# Altium PCB pic_programmer.altium-saved.PcbDoc
Units mil, origin at the board's own origin, x right, y up, seen from the top; angles counter-clockwise.
Board outline 6300 x 3900 mil, 2 copper layers (top_layer, bottom_layer), stack 65.792 mil thick; 63 components, 111 nets, 247 pads, 6 vias.
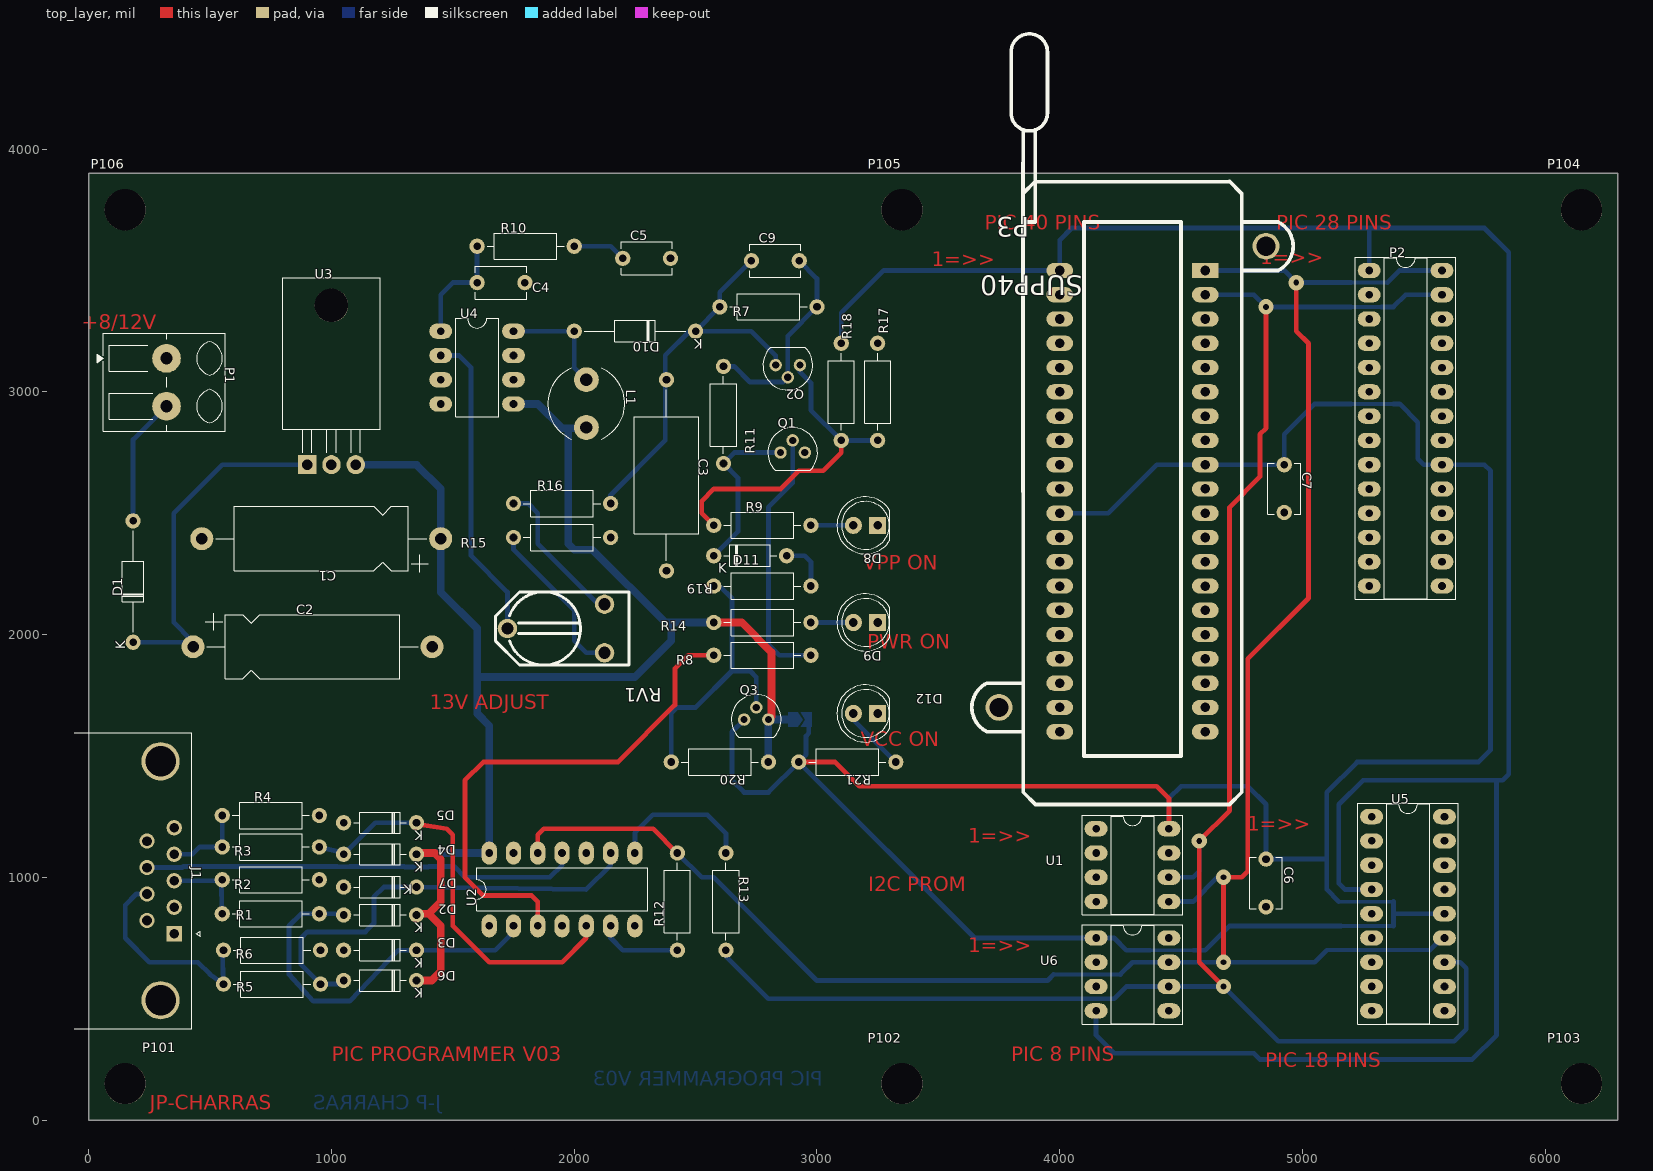
[diagram p0: top_layer view]
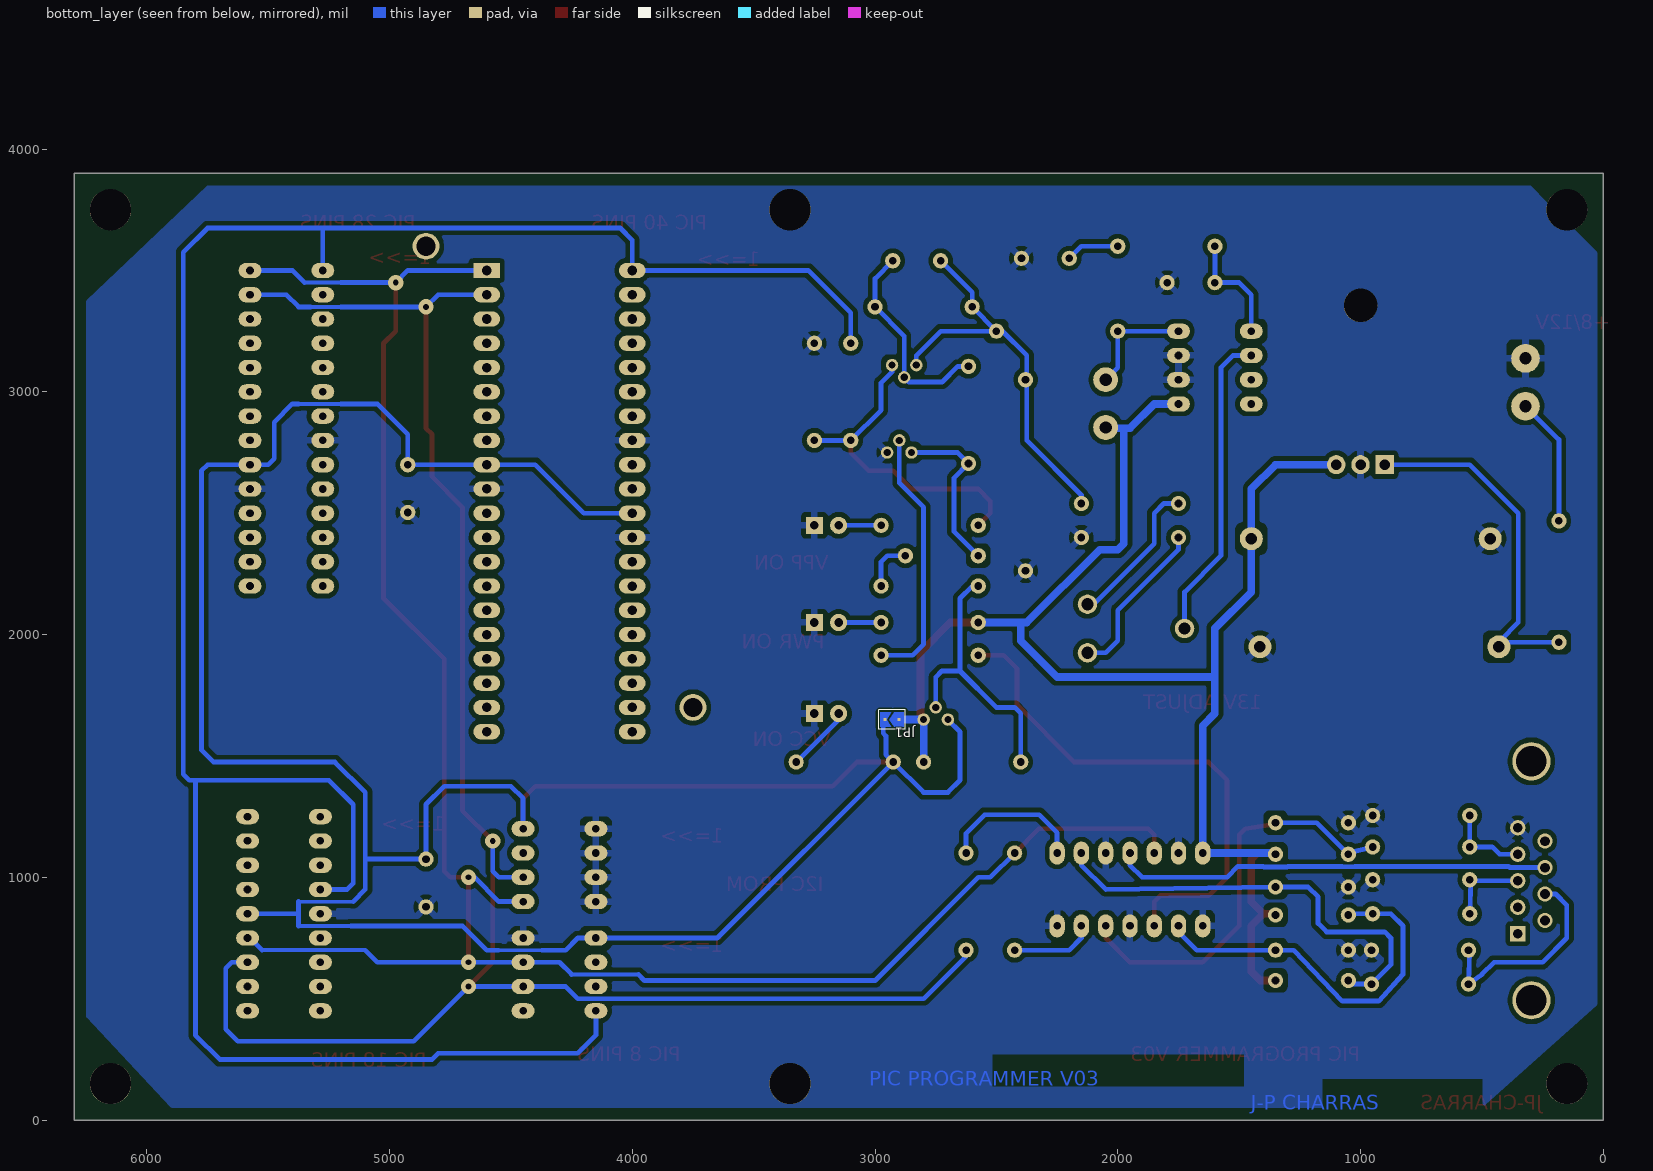
[diagram p1: bottom_layer view, seen from below]

## Layer stack, top to bottom
Top Solder: solder mask 0.4, Solder Resist, Dk 3.5
top_layer: signal copper 1.4
Dielectric 1: core 62.9921, FR-4, Dk 4.5
bottom_layer: signal copper 1.4
Bottom Solder: solder mask 0.4, Solder Resist, Dk 3.5

## Board outline
6300,0 0,0 0,3900 3950,3900 6300,3900

## Design rules (kind name [scope] priority, off if disabled: settings)
BoardOutlineClearance [All] p1: gap=0.39 ignorepadtopadclearanceinfootprint=FALSE
Clearance Clearance_POWER [InNetClass('POWER')] p1: gap=11.02 ignorepadtopadclearanceinfootprint=FALSE
Clearance "Clearance_Polygon 0" [InNamedPolygon('Polygon 0')] p2: gap=20 ignorepadtopadclearanceinfootprint=FALSE
Clearance [All] p3: gap=9.84 ignorepadtopadclearanceinfootprint=FALSE
DiffPairsRouting [All] p1: maxlimit=9.84 minlimit=9.84 mostfreqgap=9.84 toplayer_minwidth=15 toplayer_maxwidth=15 toplayer_prefwidth=9.84 bottomlayer_minwidth=15 bottomlayer_maxwidth=15 bottomlayer_prefwidth=15 maxuncoupledlength=500
HoleSize [All] p1: absolutevalues=TRUE maxlimit=169.29 minlimit=19.68 maxpercent=80.000 minpercent=20.000
HoleToHoleClearance [All] p1: gap=9.84 allowstackedmicrovias=FALSE
MinimumAnnularRing [All] p1: minimumring=1.97
PolygonConnect "PolygonConnect_Polygon 0" [InNamedPolygon('Polygon 0')] p1: connectstyle=Relief reliefconductorwidth=25 reliefentries=4 polygonreliefangle="90 Angle" airgapwidth=20
PolygonConnect [All] p2: connectstyle=Relief reliefconductorwidth=19.68 reliefentries=4 polygonreliefangle="90 Angle" airgapwidth=19.68
RoutingVias RoutingVias_POWER [InNetClass('POWER')] p1: holewidth=23.62 width=62.99 viastyle="Through Hole" minholewidth=19.68 minwidth=35.43 maxholewidth=23.62 maxwidth=62.99
RoutingVias [All] p2: holewidth=23.62 width=62.99 viastyle="Through Hole" minholewidth=19.68 minwidth=35.43 maxholewidth=23.62 maxwidth=62.99
SilkToSilkClearance [All] p1: silktosilkclearance=0
SolderMaskExpansion [All] p1: expansion=0 istentingtop=FALSE
Width Width_POWER [InNetClass('POWER')] p1: maxlimit=31.5 minlimit=9.84 preferedwidth=31.5
Width [All] p2: maxlimit=31.5 minlimit=9.84 preferedwidth=19.68
26 further rules are at their usual default settings.

## Classes and differential pairs
net class POWER: GND VCC

## Components (designator, comment, footprint, x,y, rotation, side; value= is the part's Value field where it differs from the comment)
C1 "100µF" CP_Axial_L18.0mm_D6.5mm_P25.00mm_Horizontal 1450,2395 r180 top
C2 "220uF" CP_Axial_L18.0mm_D6.5mm_P25.00mm_Horizontal 430,1950 r0 top
C3 "22uF/25V" C_Axial_L12.0mm_D6.5mm_P20.00mm_Horizontal 2380,3050 r270 top
C4 "0" C_Disc_D5.1mm_W3.2mm_P5.00mm 1600,3450 r0 top
C5 "10nF" C_Disc_D5.1mm_W3.2mm_P5.00mm 2200,3550 r0 top
C6 "100nF" C_Disc_D5.1mm_W3.2mm_P5.00mm 4850,1075 r270 top
C7 "100nF" C_Disc_D5.1mm_W3.2mm_P5.00mm 4925,2700 r270 top
C9 "220nF" C_Disc_D5.1mm_W3.2mm_P5.00mm 2730,3540 r0 top
D1 "1N4004" D_DO-35_SOD27_P12.70mm_Horizontal 182.68,1968.5 r90 top
D2 "BAT43" D_DO-35_SOD27_P7.62mm_Horizontal 1350,845 r180 top
D3 "BAT43" D_DO-35_SOD27_P7.62mm_Horizontal 1350,700 r180 top
D4 "BAT43" D_DO-35_SOD27_P7.62mm_Horizontal 1350,1095 r180 top
D5 "BAT43" D_DO-35_SOD27_P7.62mm_Horizontal 1350,1225 r180 top
D6 "BAT43" D_DO-35_SOD27_P7.62mm_Horizontal 1350,575 r180 top
D7 "BAT43" D_DO-35_SOD27_P7.62mm_Horizontal 1350,960 r180 top
D8 "RED-LED" LED_D5.0mm 3250,2450 r180 top
D9 "GREEN-LED" LED_D5.0mm 3250,2050 r180 top
D10 "SCHOTTKY" D_DO-35_SOD27_P12.70mm_Horizontal 2500,3250 r180 top
D11 "BAT43" D_DO-35_SOD27_P7.62mm_Horizontal 2575,2325 r0 top
D12 "YELLOW-LED" LED_D5.0mm 3250,1675 r180 top
J1 "DB9-FEMAL" DSUB-9_Socket_Horizontal_P2.77x2.84mm_EdgePinOffset7.70mm_Housed_MountingHolesOffset9.12mm 351.97,767.72 r270 top
JP1 "JUMPER" SolderJumper-2_P1.3mm_Open_TrianglePad1.0x1.5mm 2930,1650 r0 bottom
L1 "22uH" L_Radial_D7.8mm_P5.00mm_Fastron_07HCP 2050,3050 r270 top
P1 "CONN_2" Altech_AK300_1x02_P5.00mm_45-Degree 320.47,3137.8 r270 top
P2 "SUPP28" DIP-28_W7.62mm_Socket_LongPads 5275,3500 r0 top
P3 "SUPP40" 40tex-Ell600 4000,3500 r0 top
P101 "CONN_1" MountingHole_4.3mm_M4 150,150 r0 top
P102 "CONN_1" MountingHole_4.3mm_M4 3350,150 r0 top
P103 "CONN_1" MountingHole_4.3mm_M4 6150,150 r0 top
P104 "CONN_1" MountingHole_4.3mm_M4 6150,3750 r0 top
P105 "CONN_1" MountingHole_4.3mm_M4 3350,3750 r0 top
P106 "CONN_1" MountingHole_4.3mm_M4 150,3750 r0 top
Q1 "BC237" TO-92 2850,2750 r0 top
Q2 "BC307" TO-92 2930,3110 r180 top
Q3 "BC307" TO-92 2700,1650 r0 top
R1 "10K" R_Axial_DIN0207_L6.3mm_D2.5mm_P10.16mm_Horizontal 550,850 r0 top
R2 "10K" R_Axial_DIN0207_L6.3mm_D2.5mm_P10.16mm_Horizontal 550,990 r0 top
R3 "10K" R_Axial_DIN0207_L6.3mm_D2.5mm_P10.16mm_Horizontal 550,1125 r0 top
R4 "10K" R_Axial_DIN0207_L6.3mm_D2.5mm_P10.16mm_Horizontal 550,1255 r0 top
R5 "10K" R_Axial_DIN0207_L6.3mm_D2.5mm_P10.16mm_Horizontal 555,560 r0 top
R6 "10K" R_Axial_DIN0207_L6.3mm_D2.5mm_P10.16mm_Horizontal 555,700 r0 top
R7 "10K" R_Axial_DIN0207_L6.3mm_D2.5mm_P10.16mm_Horizontal 2600,3350 r0 top
R8 "1K" R_Axial_DIN0207_L6.3mm_D2.5mm_P10.16mm_Horizontal 2575,1915 r0 top
R9 "2.2K" R_Axial_DIN0207_L6.3mm_D2.5mm_P10.16mm_Horizontal 2575,2450 r0 top
R10 "5,1K" R_Axial_DIN0207_L6.3mm_D2.5mm_P10.16mm_Horizontal 1600,3600 r0 top
R11 "22K" R_Axial_DIN0207_L6.3mm_D2.5mm_P10.16mm_Horizontal 2615,2705 r90 top
R12 "470" R_Axial_DIN0207_L6.3mm_D2.5mm_P10.16mm_Horizontal 2425,700 r90 top
R13 "470" R_Axial_DIN0207_L6.3mm_D2.5mm_P10.16mm_Horizontal 2625,1100 r270 top
R14 "470" R_Axial_DIN0207_L6.3mm_D2.5mm_P10.16mm_Horizontal 2575,2050 r0 top
R15 "6.2K" R_Axial_DIN0207_L6.3mm_D2.5mm_P10.16mm_Horizontal 1750,2400 r0 top
R16 "62K" R_Axial_DIN0207_L6.3mm_D2.5mm_P10.16mm_Horizontal 1750,2540 r0 top
R17 "22K" R_Axial_DIN0207_L6.3mm_D2.5mm_P10.16mm_Horizontal 3250,2800 r90 top
R18 "220" R_Axial_DIN0207_L6.3mm_D2.5mm_P10.16mm_Horizontal 3100,2800 r90 top
R19 "2.2K" R_Axial_DIN0207_L6.3mm_D2.5mm_P10.16mm_Horizontal 2975,2200 r180 top
R20 "2.2K" R_Axial_DIN0207_L6.3mm_D2.5mm_P10.16mm_Horizontal 2800,1475 r180 top
R21 "470" R_Axial_DIN0207_L6.3mm_D2.5mm_P10.16mm_Horizontal 3325,1475 r180 top
RV1 "1K" RV2X4 2125,1925 r180 top
U1 "24Cxx" DIP-8_W7.62mm_Socket_LongPads 4150,1200 r0 top
U2 "74HC125" DIP-14_W7.62mm_LongPads 1650,800 r90 top
U3 "7805" TO-220-3_Horizontal_TabDown 900,2700 r0 top
U4 "LT1373" DIP-8_W7.62mm_LongPads 1450,3250 r0 top
U5 "PIC_18_PINS" DIP-18_W7.62mm_Socket_LongPads 5285,1250 r0 top
U6 "PIC_8_PINS" DIP-8_W7.62mm_Socket_LongPads 4150,750 r0 top

## Footprints (in the part's own frame and the unit in brackets; to place one, negate y for a bottom-side part, rotate by r counter-clockwise, add the part's x,y. Pads: shape width x height; smd on the part's side, far side on the other; paste and mask are expansions set on the pad)
40tex-Ell600 [mm]
  oval 2.8x1.6 hole 1: 1(0,0) 2(0,-2.54) 3(0,-5.08) 4(0,-7.62) 5(0,-10.16) 6(0,-12.7) 7(0,-15.24) 8(0,-17.78) 9(0,-20.32) 10(0,-22.86) 11(0,-25.4) 12(0,-27.94) 13(0,-30.48) 14(0,-33.02) 15(0,-35.56) 16(0,-38.1) 17(0,-40.64) 18(0,-43.18) 19(0,-45.72) 20(0,-48.26) 21(15.24,-48.26) 22(15.24,-45.72) 23(15.24,-43.18) 24(15.24,-40.64) 25(15.24,-38.1) 26(15.24,-35.56) 27(15.24,-33.02) 28(15.24,-30.48) 29(15.24,-27.94) 30(15.24,-25.4) 31(15.24,-22.86) 32(15.24,-20.32) 33(15.24,-17.78) 34(15.24,-15.24) 35(15.24,-12.7) 36(15.24,-10.16) 37(15.24,-7.62) 38(15.24,-5.08) 39(15.24,-2.54)
  rect 2.8x1.6 hole 1: 40(15.24,0)
  round 2.8 hole 2: ""(-6.35,-45.72) ""(21.59,2.54)
  silkscreen extent -9.19,-55.88 24.43,24.76
Altech_AK300_1x02_P5.00mm_45-Degree [mm]
  round 3 hole 1.3: 1(0,0) 2(5,0)
  silkscreen extent -2.62,-7.23 7.62,6.12
C_Axial_L12.0mm_D6.5mm_P20.00mm_Horizontal [mm]
  round 1.6 hole 0.8: 1(0,0) 2(20,0)
  silkscreen extent 1.04,-3.37 18.96,3.37
C_Disc_D5.1mm_W3.2mm_P5.00mm [mm]
  round 1.6 hole 0.8: 1(0,0) 2(5,0)
  silkscreen extent -0.17,-1.72 5.17,1.72
CP_Axial_L18.0mm_D6.5mm_P25.00mm_Horizontal [mm]
  round 2.4 hole 1.2: 1(0,0) 2(25,0)
  silkscreen extent 1.28,-3.37 23.56,3.5
D_DO-35_SOD27_P7.62mm_Horizontal [mm]
  round 1.6 hole 0.8: 1(0,0) 2(7.62,0)
  silkscreen extent 1.04,-1.12 6.58,1.12
D_DO-35_SOD27_P12.70mm_Horizontal [mm]
  round 1.6 hole 0.8: 1(0,0) 2(12.7,0)
  silkscreen extent 1.04,-1.12 11.66,1.12
DIP-8_W7.62mm_LongPads [mm]
  oval 2.4x1.6 hole 0.8: 1(0,0) 2(0,-2.54) 3(0,-5.08) 4(0,-7.62) 5(7.62,-7.62) 6(7.62,-5.08) 7(7.62,-2.54) 8(7.62,0)
  silkscreen extent 1.56,-8.95 6.06,1.33
DIP-8_W7.62mm_Socket_LongPads [mm]
  oval 2.4x1.6 hole 0.8: 1(0,0) 2(0,-2.54) 3(0,-5.08) 4(0,-7.62) 5(7.62,-7.62) 6(7.62,-5.08) 7(7.62,-2.54) 8(7.62,0)
  silkscreen extent -1.44,-9.01 9.06,1.39
DIP-14_W7.62mm_LongPads [mm]
  oval 2.4x1.6 hole 0.8: 1(0,0) 2(0,-2.54) 3(0,-5.08) 4(0,-7.62) 5(0,-10.16) 6(0,-12.7) 7(0,-15.24) 8(7.62,-15.24) 9(7.62,-12.7) 10(7.62,-10.16) 11(7.62,-7.62) 12(7.62,-5.08) 13(7.62,-2.54) 14(7.62,0)
  silkscreen extent 1.56,-16.57 6.06,1.33
DIP-18_W7.62mm_Socket_LongPads [mm]
  oval 2.4x1.6 hole 0.8: 1(0,0) 2(0,-2.54) 3(0,-5.08) 4(0,-7.62) 5(0,-10.16) 6(0,-12.7) 7(0,-15.24) 8(0,-17.78) 9(0,-20.32) 10(7.62,-20.32) 11(7.62,-17.78) 12(7.62,-15.24) 13(7.62,-12.7) 14(7.62,-10.16) 15(7.62,-7.62) 16(7.62,-5.08) 17(7.62,-2.54) 18(7.62,0)
  silkscreen extent -1.44,-21.71 9.06,1.39
DIP-28_W7.62mm_Socket_LongPads [mm]
  oval 2.4x1.6 hole 0.8: 1(0,0) 2(0,-2.54) 3(0,-5.08) 4(0,-7.62) 5(0,-10.16) 6(0,-12.7) 7(0,-15.24) 8(0,-17.78) 9(0,-20.32) 10(0,-22.86) 11(0,-25.4) 12(0,-27.94) 13(0,-30.48) 14(0,-33.02) 15(7.62,-33.02) 16(7.62,-30.48) 17(7.62,-27.94) 18(7.62,-25.4) 19(7.62,-22.86) 20(7.62,-20.32) 21(7.62,-17.78) 22(7.62,-15.24) 23(7.62,-12.7) 24(7.62,-10.16) 25(7.62,-7.62) 26(7.62,-5.08) 27(7.62,-2.54) 28(7.62,0)
  silkscreen extent -1.44,-34.41 9.06,1.39
DSUB-9_Socket_Horizontal_P2.77x2.84mm_EdgePinOffset7.70mm_Housed_MountingHolesOffset9.12mm [mm]
  rect 1.6x1.6 hole 1: 1(0,0)
  round 1.6 hole 1: 2(-2.77,0) 3(-5.54,0) 4(-8.31,0) 5(-11.08,0) 6(-1.385,-2.84) 7(-4.155,-2.84) 8(-6.925,-2.84) 9(-9.695,-2.84)
  round 4 hole 3.2: SH(-18.04,-1.42) SH(6.96,-1.42)
  silkscreen extent -21.02,-10.48 9.94,2.75
L_Radial_D7.8mm_P5.00mm_Fastron_07HCP [mm]
  round 2.6 hole 1.3: 1(0,0) 2(5,0)
  silkscreen extent -1.2,-4.02 6.2,4.02
LED_D5.0mm [mm]
  rect 1.8x1.8 hole 0.9: 1(0,0)
  round 1.8 hole 0.9: 2(2.54,0)
  silkscreen extent -1.29,-2.99 4.26,2.99
MountingHole_4.3mm_M4 [mm]
  round 4.3 hole 4.3 unplated: ""(0,0)
R_Axial_DIN0207_L6.3mm_D2.5mm_P10.16mm_Horizontal [mm]
  round 1.6 hole 0.8: 1(0,0) 2(10.16,0)
  silkscreen extent 1.04,-1.37 9.12,1.37
RV2X4 [mil]
  round 80 hole 50: 1(0,0) 2(400,-100) 3(0,-200)
  silkscreen extent -100,-251 450,50
SolderJumper-2_P1.3mm_Open_TrianglePad1.0x1.5mm [mm]
  rect 0.3x0.3 smd paste-0.3: 1(-0.725,0) 2(0.725,0)
  top_layer region: 0.275,0 -0.225,-0.75 -1.225,-0.75 -1.225,0.75 -0.225,0.75
  top_layer region: 1.225,-0.75 0.075,-0.75 0.575,0 0.075,0.75 1.225,0.75
  silkscreen extent -1.4,-1 1.4,1
TO-92 [mm]
  round 1.3 hole 0.75: 1(0,0) 2(1.27,1.27) 3(2.54,0)
  silkscreen extent -1.33,-1.85 3.87,2.6
TO-220-3_Horizontal_TabDown [mm]
  rect 1.905x2 hole 1.1: 1(0,0)
  oval 1.905x2 hole 1.1: 2(2.54,0) 3(5.08,0)
  round 3.5 hole 3.5 unplated: ""(2.54,16.66)
  silkscreen extent -2.57,1.26 7.65,19.57

## Via types
v1: diameter 62.99, hole 23.62, top_layer to bottom_layer, 6 vias

## Nets (pads, with @x,y where several pads share a name; then routed paths per layer and width w, separated by ;. In a path a pad name is that pad's centre, name@x,y a point inside that pad or via, vN(x,y) a via of type N, cw(c..) or ccw(c..) an arc to the next point about the centre after c; other vN are vias at no path point)
/CLOCK-RB6: P2.27 P3.39 R13.2 U1.6 U5.12 U6.6 | length 7874.6
  top_layer w19.68: v1(4675,550) 4575,650 v1(4575,1150) 4700,1275 4700,2525 4825,2650 4825,2825 4850,2850 v1(4850,3350)
  bottom_layer w17: 4075,500 4225,500 ; 5200,3350 5325,3350
  bottom_layer w19.68: R13.2 2625,675 2800,500 4075,500 ; 4225,500 4275,550 U6.6 v1(4675,550) 4900,325 5625,325 5675,375 5675,625 5650,650 U5.12@5575,650 ; U1.6 4550,1000 4575,1025 v1(4575,1150) ; P3.39 4800,3400 v1(4850,3350) 5200,3350 ; 5325,3350 5375,3350 5425,3400 P2.27
/DATA-RB7: P2.28 P3.40 R12.2 U1.5 U2.12 U5.13 U6.7 | length 8434.2
  top_layer w19.68: U2.12 1850,1175 1875,1200 2325,1200 R12.2 ; v1(4675,650) v1(4675,1000) 4750,1000 4775,1025 4775,1900 5025,2150 5025,3200 4975,3250 v1(4975,3450)
  bottom_layer w15.75: 5100,700 5525,700
  bottom_layer w17: 3975,600 4250,600 ; 5200,3450 5350,3450
  bottom_layer w19.68: R12.2 2525,1000 2575,1000 3000,575 3950,575 3975,600 ; 4250,600 4300,650 U6.7 v1(4675,650) 5050,650 5100,700 ; U1.5 4550,900 4650,1000 v1(4675,1000) ; P3.40 4925,3500 v1(4975,3450) 5200,3450 ; 5350,3450 5400,3500 P2.28 ; 5525,700 U5.13@5575,750
/PC-CLOCK-OUT: J1.7 R5.1 R6.1 | length 865
  bottom_layer w19.68: J1.7 195.62,931.3 150,885.68 150,875 150,750 250,650 450,650 500,600 R5.1 R6.1@550,700
/PC-DATA-IN: J1.8 U2.11 | length 1804.1
  bottom_layer w19.68: J1.8 384.45,1040.35 389.09,1045 445,1045 1024.25,1045 1025.43,1043.82 1074.57,1043.82 1075.75,1045 1299.45,1045 1301.81,1042.64 1398.19,1042.64 1400.55,1045 1505,1045 1550,1000 1900,1000 1950,1050 U2.11
/PC-DATA-OUT: J1.4 R3.1 R4.1 | length 340.5
  bottom_layer w19.68: J1.4 427.26,1094.88 457.38,1125 R3.1 R4.1
/pic_sockets/VCC_PIC: C6.1 C7.1 JP1.2 P2.20 P3.11 P3.32 Q3.1 R21.2 U1.8 U5.14 U6.1 | length 11516.6
  top_layer w19.68: R21.2 3075,1475 3175,1375 3800,1375 4400,1375 4450,1325 U1.8
  bottom_layer w13.78: 4371.65,700 4550,700 ; 5150,900 5375,900
  bottom_layer w15.75: 5160.39,799.61 5321.62,799.61 5322.02,800 5375,800 ; 5200,2950 5375,2950
  bottom_layer w19.68: Q3.1 2650,1600 2650,1400 2700,1350 2800,1350 R21.2 ; 2966.42,1650 2966.42,1593.54 2955,1582.13 2955,1505 R21.2 ; P3.11 4200,2500 4400,2700 P3.32 C7.1 4925,2825 5050,2950 5200,2950 ; 4371.65,700 4275,700 4225,750 U6.1 3650,750 R21.2 ; U1.8 4450,1325 4500,1375 4775,1375 4850,1300 C6.1 5100,1075 ; 4550,700 4600,700 4700,800 5160,800 5160.39,799.61 ; 5150,900 5100,950 5100,1075 ; 5375,800 5375,850 ; 5375,900 5375,850 ; 5375,2950 5400,2950 5475,2875 5475,2725 5500,2700 P2.20 5750,2700 5775,2675 5775,1525 5725,1475 5225,1475 5100,1350 5100,1075 ; U5.14@5575,850 5375,850
/VPP_ON: J1.3 R1.1 R2.1 | length 339.8
  bottom_layer w19.68: J1.3 545.83,985.83 R2.1 ; R2.1@545,990 R1.1
/VPP{slash}MCLR: P2.1 P3.1 R18.2 U5.4 U6.4 | length 9554.6
  bottom_layer w19.68: R18.2 3100,3325 3275,3500 P3.1 4000,3625 4050,3675 5275,3675 ; U6.4 4150,350 4225,275 4800,275 4825,250 5700,250 5800,350 5800,1400 ; U5.4@5275,950 5175,950 5150,975 5150,1300 5250,1400 5800,1400 ; P2.1 5275,3675 ; 5275,3675 5750,3675 5850,3575 5850,1425 5825,1400 5800,1400
GND: C1.2 C2.2 C3.2 C4.2 C5.2 C6.2 C7.2 D3.2 D5.2 D7.2 D8.1 D9.1 D12.1 J1.5 P1.1 P2.8 P2.19 P3.8 P3.12 P3.31 Q1.3 R2.2 R4.2 R6.2 R15.2 R17.2 U1.1 U1.2 U1.3 U1.4 U2.1 U2.4 U2.7 U2.10 U2.13 U3.2 U4.6 U4.7 U5.5 U6.8
Net-(C5-Pad1): C5.1 R10.2 | length 220.7
  bottom_layer w19.68: R10.2 2150,3600 C5.1
Net-(D1-A): D1.2 P1.2 | length 529.5
  bottom_layer w19.68: D1.2 182.68,2803.15 P1.2
Net-(D1-K): C2.1 D1.1 U3.1 | length 1468.9
  bottom_layer w19.68: D1.1 411.5,1968.5 C2.1 ; C2.1@425,1950 425,1975 350,2050 350,2500 550,2700 U3.1
Net-(D2-A): D2.2 D3.1 R1.2 U2.2 | length 1565.4
  bottom_layer w19.68: D2.2@1050,850 R1.2 875,850 825,800 825,600 925,490 1075,490 1275,700 D3.1 1675,700 1750,775 U2.2
Net-(D4-A): D4.2 D5.1 R3.2 U2.5 | length 1697.4
  top_layer w19.68: D5.1@1350,1220 1475,1200 1500,1175 1500,800 1650,650 1950,650 2050,750 U2.5
  bottom_layer w19.68: R3.2 D4.2@1050,1100 ; D4.2 1180,1225 D5.1
Net-(D6-A): D6.2 D7.1 R5.2 U2.9 | length 1842.3
  bottom_layer w19.68: D6.2 1035,560 R5.2 875,640 875,675 875,750 900,775 1140,775 1175,810 1175,920 1215,960 D7.1 2050,950 2150,1050 U2.9
Net-(D8-A): D8.2 R9.2 | length 175
  bottom_layer w19.68: R9.2 D8.2
Net-(D9-A): D9.2 R14.2 | length 175
  bottom_layer w19.68: R14.2 D9.2
Net-(D10-A): D10.2 L1.1 U4.8 | length 470.7
  bottom_layer w19.68: U4.8 D10.2 2000,3100 L1.1
Net-(D11-A): D11.2 R19.1 | length 210.4
  bottom_layer w19.68: D11.2 2950,2325 2975,2300 R19.1
Net-(D11-K): D11.1 Q1.1 R11.1 | length 699.9
  bottom_layer w19.68: D11.1 2675,2425 2675,2645 R11.1 2660,2750 Q1.1
Net-(D12-A): D12.2 R21.1 | length 272.5
  bottom_layer w19.68: D12.2 3150,1650 R21.1
Net-(Q1-B): Q1.2 R8.2 | length 1075.1
  bottom_layer w19.68: Q1.2 2900,2700 2900,2625 2800,2525 2800,1960 2845,1915 R8.2
Net-(Q2-B): C9.2 Q2.2 R7.2 R11.2 | length 860
  bottom_layer w19.68: R11.2 2659.54,3105 2724.23,3040.32 2860.31,3040.32 Q2.2 2880,3230 R7.2 3000,3466.85 C9.2
Net-(Q2-C): Q2.1 R9.1 R17.1 R18.1 | length 1359
  top_layer w19.68: R9.1 2525,2500 2525,2550 2575,2600 2850,2600 2925,2675 3025,2675 3100,2750 R18.1
  bottom_layer w19.68: Q2.1 2930,3082.16 2975,3037.16 2975,2925 R18.1 R17.1
Net-(Q3-B): Q3.2 R19.2 R20.2 | length 1153.6
  bottom_layer w19.68: R20.2 2400,1675 2425,1700 2500,1700 2650,1850 ; R19.2 2600,2200 2650,2150 2650,1850 ; Q3.2 2750,1825 2725,1850 2650,1850
Net-(R8-Pad1): R8.1 U2.3 | length 2167.6
  top_layer w19.68: U2.3 1850,900 1825,925 1625,925 1550,1000 1550,1400 1625,1475 2180,1475 2415,1710 2415,1860 2470,1915 R8.1
Net-(R12-Pad1): R12.1 U2.6 | length 345.7
  bottom_layer w19.68: U2.6 2150,750 2200,700 R12.1
Net-(R13-Pad1): R13.1 U2.8 | length 603.1
  bottom_layer w19.68: U2.8 2250,1184 2324,1258 2549,1258 2625,1182 R13.1
Net-(R15-Pad1): R15.1 RV1.1 | length 674.3
  bottom_layer w19.68: R15.1 1750,2350 2000,2100 2000,1975 2050,1925 RV1.1
Net-(R16-Pad1): R16.1 RV1.3 | length 620.1
  bottom_layer w19.68: R16.1 1810,2540 1850,2500 1850,2375 2100,2125 RV1.3
Net-(U4-FB+): RV1.2 U4.2 | length 1282.8
  bottom_layer w19.68: U4.2 1525,3150 1575,3100 1575,2325 1725,2175 RV1.2
Net-(U4-Vc): C4.1 R10.1 U4.1 | length 470.7
  bottom_layer w19.68: U4.1 1450,3400 1500,3450 C4.1 R10.1
unconnected-(J1-P6-Pad6): J1.6
unconnected-(J1-P9-Pad9): J1.9
unconnected-(J1-Pad1): J1.1
unconnected-(J1-Pad2): J1.2
unconnected-(P2-Pad2): P2.2
unconnected-(P2-Pad3): P2.3
unconnected-(P2-Pad4): P2.4
unconnected-(P2-Pad5): P2.5
unconnected-(P2-Pad6): P2.6
unconnected-(P2-Pad7): P2.7
unconnected-(P2-Pad9): P2.9
unconnected-(P2-Pad10): P2.10
unconnected-(P2-Pad11): P2.11
unconnected-(P2-Pad12): P2.12
unconnected-(P2-Pad13): P2.13
unconnected-(P2-Pad14): P2.14
unconnected-(P2-Pad15): P2.15
unconnected-(P2-Pad16): P2.16
unconnected-(P2-Pad17): P2.17
unconnected-(P2-Pad18): P2.18
unconnected-(P2-Pad21): P2.21
unconnected-(P2-Pad22): P2.22
unconnected-(P2-Pad23): P2.23
unconnected-(P2-Pad24): P2.24
unconnected-(P2-Pad25): P2.25
unconnected-(P2-Pad26): P2.26
unconnected-(P3-Pad2): P3.2
unconnected-(P3-Pad3): P3.3
unconnected-(P3-Pad4): P3.4
unconnected-(P3-Pad5): P3.5
unconnected-(P3-Pad6): P3.6
unconnected-(P3-Pad7): P3.7
unconnected-(P3-Pad9): P3.9
unconnected-(P3-Pad10): P3.10
unconnected-(P3-Pad13): P3.13
unconnected-(P3-Pad14): P3.14
unconnected-(P3-Pad15): P3.15
unconnected-(P3-Pad16): P3.16
unconnected-(P3-Pad17): P3.17
unconnected-(P3-Pad18): P3.18
unconnected-(P3-Pad19): P3.19
unconnected-(P3-Pad20): P3.20
unconnected-(P3-Pad21): P3.21
unconnected-(P3-Pad22): P3.22
unconnected-(P3-Pad23): P3.23
unconnected-(P3-Pad24): P3.24
unconnected-(P3-Pad25): P3.25
unconnected-(P3-Pad26): P3.26
unconnected-(P3-Pad27): P3.27
unconnected-(P3-Pad28): P3.28
unconnected-(P3-Pad29): P3.29
unconnected-(P3-Pad30): P3.30
unconnected-(P3-Pad33): P3.33
unconnected-(P3-Pad34): P3.34
unconnected-(P3-Pad35): P3.35
unconnected-(P3-Pad36): P3.36
unconnected-(P3-Pad37): P3.37
unconnected-(P3-Pad38): P3.38
unconnected-(U1-WP-Pad7): U1.7
unconnected-(U4-FB--Pad3): U4.3
unconnected-(U4-S{slash}S-Pad4): U4.4
unconnected-(U5-OSC1{slash}CLKI-Pad16): U5.16
unconnected-(U5-OSC2{slash}CLKO-Pad15): U5.15
unconnected-(U5-RA0-Pad17): U5.17
unconnected-(U5-RA1-Pad18): U5.18
unconnected-(U5-RA2-Pad1): U5.1
unconnected-(U5-RA3-Pad2): U5.2
unconnected-(U5-RB0-Pad6): U5.6
unconnected-(U5-RB1-Pad7): U5.7
unconnected-(U5-RB2-Pad8): U5.8
unconnected-(U5-RB3-Pad9): U5.9
unconnected-(U5-RB4-Pad10): U5.10
unconnected-(U5-RB5-Pad11): U5.11
unconnected-(U5-T0ckl-Pad3): U5.3
unconnected-(U6-GP2-Pad5): U6.5
unconnected-(U6-GP4{slash}OSC2-Pad3): U6.3
unconnected-(U6-GP5{slash}OSC1-Pad2): U6.2
VCC: C1.1 D2.1 D4.1 D6.1 JP1.1 L1.2 Q3.3 R14.1 R20.1 U2.14 U3.3 U4.5 | length 6393.5
  top_layer w31.5: D6.1 1412.99,575 1450,612.01 1450,800 1400,850 ; D2.1@1350,850 1400,850 ; D4.1@1350,1100 1425,1100 1450,1075 1450,900 1400,850 ; R14.1 2690,2050 2812.6,1927.4 2812.6,1662.6 Q3.3
  bottom_layer w31.5: U3.3 1350,2700 1450,2600 1450,2400 1450,2175 1600,2025 1600,1825 ; D4.1@1350,1100 U2.14 1650,1375 1650,1625 1600,1675 1600,1825 ; U4.5 1850,2950 1950,2850 1975,2850 ; L1.2@2050,2850 1975,2850 ; R14.1 2400,2050 ; R20.1 2800,1645 Q3.3 JP1.1@2905,1650 ; 1600,1825 2250,1825 2400,1975 2400,2050 ; 1975,2850 1975,2375 2000,2350 2075,2350 2375,2050 2400,2050
VPP: C3.1 C9.1 D10.1 Q2.3 R7.1 R16.2 | length 1665.9
  bottom_layer w19.68: R16.2 2150,2575 2375,2800 2375,3050 2375,3150 2475,3250 D10.1 ; C9.1 2600,3410 R7.1 D10.1 ; Q2.3 2830,3149.37 2729.37,3250 2720,3250 D10.1
pads on no net: J1.SH P3. P101. P102. P103. P104. P105. P106. U3.

## Polygon pours and split planes (outlines as drawn)
GND on bottom_layer "Polygon 0" (solid, pour order 0): 5900,50 6250,425 6250,3375 5750,3850 300,3850 25,3575 25,475 500,50

## Other copper
top_layer:
  text "PIC 40 PINS" at 3691.17,3667.14 h60
  text "PIC 28 PINS" at 4891.17,3667.14 h60
  text "1=>>" at 4825.29,3524.82 h60
  text "1=>>" at 3472.53,3517.14 h60
  text "+8/12V" at -28.79,3257.1 h60
  text "VPP ON" at 3191.13,2267.14 h60
  text "PWR ON" at 3207.56,1942.14 h60
  text "13V ADJUST" at 1405.45,1692.14 h60
  text "VCC ON" at 3179.51,1540.56 h60
  text "1=>>" at 4772.53,1192.14 h60
  text "1=>>" at 3622.53,1142.14 h60
  text "I2C PROM" at 3211.14,942.14 h60
  text "1=>>" at 3622.53,692.14 h60
  text "PIC PROGRAMMER V03" at 1001.96,242.14 h60
  text "PIC 8 PINS" at 3799.73,242.14 h60
  text "PIC 18 PINS" at 4846.17,217.14 h60
  text "JP-CHARRAS" at 251.17,42.14 h60
bottom_layer:
  text "PIC PROGRAMMER V03" at 3023.04,142.14 h60
  text "J-P CHARRAS" at 1451.68,42.14 h60

## Text inside footprints (layer, text, board x,y; h text height)
D1: F.Fab "K" at 149.78,1939.39 h39.37 r90; Top Overlay "K" at 149.78,1939.39 h39.37 r90
D2: F.Fab "K" at 1379.11,812.1 h39.37 r180; Top Overlay "K" at 1379.11,812.1 h39.37 r180
D3: F.Fab "K" at 1379.11,667.1 h39.37 r180; Top Overlay "K" at 1379.11,667.1 h39.37 r180
D4: F.Fab "K" at 1379.11,1062.1 h39.37 r180; Top Overlay "K" at 1379.11,1062.1 h39.37 r180
D5: F.Fab "K" at 1379.11,1192.1 h39.37 r180; Top Overlay "K" at 1379.11,1192.1 h39.37 r180
D6: F.Fab "K" at 1379.11,542.1 h39.37 r180; Top Overlay "K" at 1379.11,542.1 h39.37 r180
D7: F.Fab "K" at 1379.11,927.1 h39.37 r180; Top Overlay "K" at 1331.87,970.41 h39.37 r180
D10: F.Fab "K" at 2529.11,3217.1 h39.37 r180; Top Overlay "K" at 2529.11,3217.1 h39.37 r180
D11: F.Fab "K" at 2545.89,2357.9 h39.37; Top Overlay "K" at 2593.13,2255.54 h39.37